# Altium PCB John_Main.PcbDoc (part 3 of 5)
Units mil, origin at the board's own origin, x right, y up, seen from the top; angles counter-clockwise.
Board outline 3346 x 2756 mil, 2 copper layers (Top Layer, Bottom Layer), stack 57 mil thick; 275 components, 161 nets, 721 pads, 398 vias.
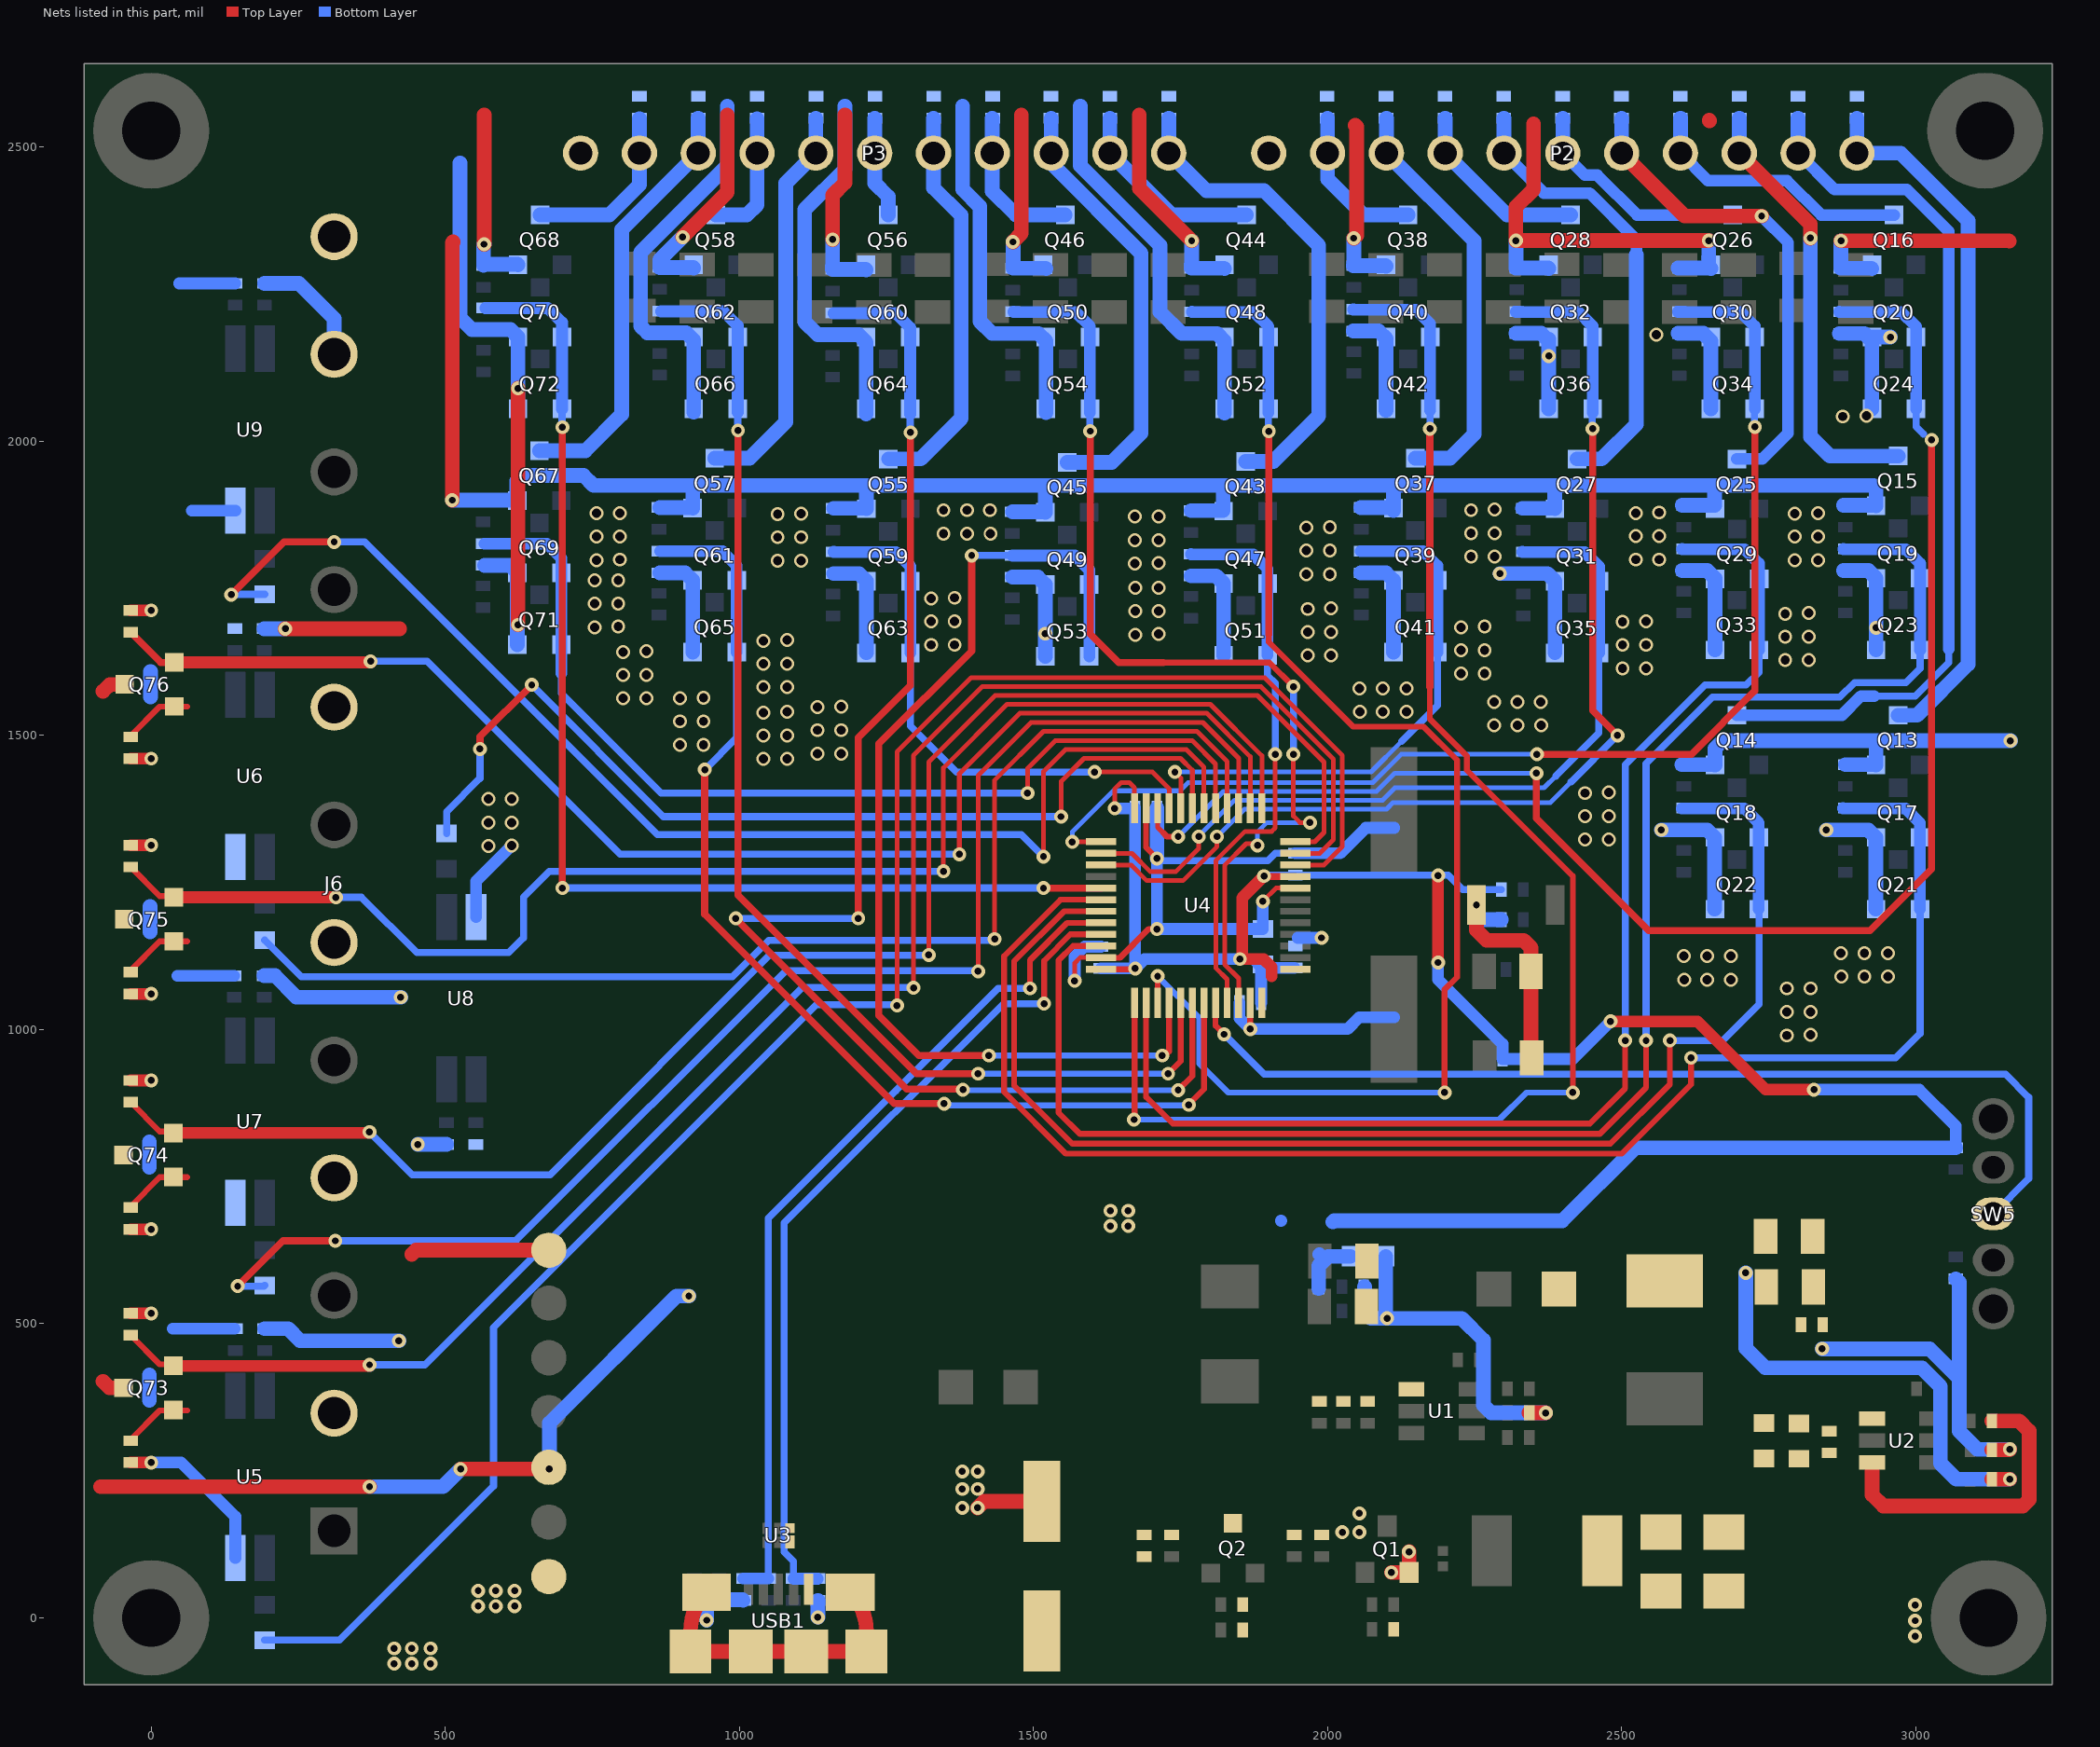
[diagram p2: the nets of this part, all layers, seen from the top]

## Part data (continued)
R67 R68 R69 R70 R79 R80 R81 R82 R87 R88 R98 R99 R100 R101 R110 R111 R112 R113 R118 R119: library part RC0402FR-07330RL, "RES SMD 330 OHM 1% 1/16W 0402", Case/Package=0402, Case Code (Metric)=1005, MANUFACTURER=Yageo, Max Operating Temperature=155°C, Max Power Dissipation=63mW, Min Operating Temperature=-55°C, Package Quantity=1, Power Rating=62.5mW, Supplier Part Number 1=311-330LRCT-ND, Temperature Coefficient=100ppm/°C, Tolerance=1%, Voltage Rating=50V, Case Code (Imperial)=0402, ComponentLink1Description=http://www.farnell.com/datasheets/1784430.pdf?src-supplier=Element14, ComponentLink1URL=http://www.farnell.com/datasheets/1784430.pdf?src-supplier=Element14, ComponentLink2Description=http://www.yageo.com/documents/recent/PYu-RC_Group_51_RoHS_L_9.pdf?src-supplier=Mouser, ComponentLink2URL=http://www.yageo.com/documents/recent/PYu-RC_Group_51_RoHS_L_9.pdf?src-supplier=Mouser, ComponentLink3Description=http://www.yageo.com/documents/recent/PYu-RC0402_51_RoHS_L_6_r.pdf?src-supplier=Future+Electronics, ComponentLink3URL=http://www.yageo.com/documents/recent/PYu-RC0402_51_RoHS_L_6_r.pdf?src-supplier=Future+Electronics, ComponentLink4Description=https://www.verical.com/server-webapp/html/getDatasheet?partID=329466&src-supplier=Verical, ComponentLink4URL=https://www.verical.com/server-webapp/html/getDatasheet?partID=329466&src-supplier=Verical, ComponentLink5Description=http://www.farnell.com/datasheets/1018594.pdf?src-supplier=Element14, ComponentLink5URL=http://www.farnell.com/datasheets/1018594.pdf?src-supplier=Element14, ComponentLink6Description=http://www.farnell.com/datasheets/2167052.pdf?src-supplier=Element14, ComponentLink6URL=http://www.farnell.com/datasheets/2167052.pdf?src-supplier=Element14, ComponentLink7Description=http://documents.rs-components.com/techlib://itc_doclist_GB.htm?stockno=6185810&src-supplier=RSComponents, ComponentLink7URL=http://documents.rs-components.com/techlib://itc_doclist_GB.htm?stockno=6185810&src-supplier=RSComponents, ComponentLink8Description=http://www.yageo.com/documents/recent/PYu-RC_Group_51_RoHS_L_10.pdf?src-supplier=Digi-Key, ComponentLink8URL=http://www.yageo.com/documents/recent/PYu-RC_Group_51_RoHS_L_10.pdf?src-supplier=Digi-Key, ComponentLink9Description=http://www.mouser.com/ds/2/447/PYu-RC0402_51_RoHS_L_6_r-8721.pdf?src-supplier=Mouser, ComponentLink9URL=http://www.mouser.com/ds/2/447/PYu-RC0402_51_RoHS_L_6_r-8721.pdf?src-supplier=Mouser, Composition="Thick Film", Depth=0.5mm, Features="Moisture Resistant", Height=0.016inch, Lead Free="Lead Free", Length=0.039inch, Manufacturer Part Number=RC0402FR-07330RL, Military Standard=Not, Number of Terminations=2, Packaging="Tape and Reel", Pricing 1="1=0.1, 10=0.016, 100=0.0067, 1000=0.003, 2500=0.0026, 5000=0.0022 (USD)", REACH SVHC=Unknown, Resistance=330R, Stock 1=6258760, Supplier 1=Digi-Key, Termination=SMD/SMT, Width=0.02inch
RF2: library part AC0402FR-0754K9L, "RES SMD 54.9K OHM 1% 1/16W 0402", Case/Package=0402, MANUFACTURER=Yageo, Max Operating Temperature=155°C, Max Power Dissipation=63mW, Min Operating Temperature=-55°C, Resistance=54.9kR, Supplier Part Number 1=YAG5675DKR-ND, Temperature Coefficient=100ppm/°C, Tolerance=1%, ComponentLink1Description=http://www.yageo.com/NewPortal/yageodocoutput?fileName=/pdf/R-Chip/PYu-AC_51_RoHS_L_6.pdf&src-supplier=Digi-Key, ComponentLink1URL=http://www.yageo.com/NewPortal/yageodocoutput?fileName=/pdf/R-Chip/PYu-AC_51_RoHS_L_6.pdf&src-supplier=Digi-Key, Composition="Thick Film", Features="Moisture Resistant,Automotive AEC-Q200", Height=0.015inch, Length=0.039inch, Manufacturer Part Number=AC0402FR-0754K9L, Number of Terminations=2, Packaging="Tape and Reel", Pricing 1="1=0.1, 10=0.021, 100=0.0087, 1000=0.0039, 2500=0.00338, 5000=0.00279 (USD)", Stock 1=3688, Supplier 1=Digi-Key, Width=0.02inch
RF10 RU1 RU2 RU3: library part RC0402JR-0720KL, "RES SMD 20K OHM 1% 1/16W 0402", Case/Package=0402, Case Code (Metric)=1005, MANUFACTURER=Yageo, Max Operating Temperature=155°C, Max Power Dissipation=63mW, Min Operating Temperature=-55°C, Package Quantity=1, Power Rating=62.5mW, Resistance=20kR, Supplier Part Number 1=311-20KJRCT-ND, Temperature Coefficient=100ppm/°C, Tolerance=5%, Voltage Rating=50V, Case Code (Imperial)=0402, ComponentLink1Description=https://industrial.panasonic.com/cdbs/www-data/pdf/RDA0000/AOA0000C301.pdf?src-supplier=Future+Electronics, ComponentLink1URL=https://industrial.panasonic.com/cdbs/www-data/pdf/RDA0000/AOA0000C301.pdf?src-supplier=Future+Electronics, ComponentLink2Description=http://www.jameco.com/Jameco/Products/ProdDS/1986781.pdf?src-supplier=Jameco, ComponentLink2URL=http://www.jameco.com/Jameco/Products/ProdDS/1986781.pdf?src-supplier=Jameco, ComponentLink3Description=http://www.farnell.com/datasheets/2059623.pdf?src-supplier=Farnell, ComponentLink3URL=http://www.farnell.com/datasheets/2059623.pdf?src-supplier=Farnell, ComponentLink4Description=http://industrial.panasonic.com/www-data/pdf/AOA0000/AOA0000CE1.pdf?src-supplier=Avnet, ComponentLink4URL=http://industrial.panasonic.com/www-data/pdf/AOA0000/AOA0000CE1.pdf?src-supplier=Avnet, ComponentLink5Description=http://www.alliedelec.com/m/d/51cd0790071e1666bdb9d00c57fcf960.pdf?src-supplier=Allied+Electronics, ComponentLink5URL=http://www.alliedelec.com/m/d/51cd0790071e1666bdb9d00c57fcf960.pdf?src-supplier=Allied+Electronics, ComponentLink6Description=http://industrial.panasonic.com/www-data/pdf/AOA0000/AOA0000CE1.pdf?src-supplier=Avnet+Europe, ComponentLink6URL=http://industrial.panasonic.com/www-data/pdf/AOA0000/AOA0000CE1.pdf?src-supplier=Avnet+Europe, ComponentLink7Description=http://www.farnell.com/datasheets/2059623.pdf?src-supplier=Element14, ComponentLink7URL=http://www.farnell.com/datasheets/2059623.pdf?src-supplier=Element14, ComponentLink8Description=http://industrial.panasonic.com/cdbs/www-data/pdf/RDA0000/AOA0000C301.pdf?src-supplier=Farnell, ComponentLink8URL=http://industrial.panasonic.com/cdbs/www-data/pdf/RDA0000/AOA0000C301.pdf?src-supplier=Farnell, ComponentLink9Description=http://industrial.panasonic.com/www-data/pdf/AOA0000/AOA0000CE1.pdf?src-supplier=Avnet+Asia, ComponentLink9URL=http://industrial.panasonic.com/www-data/pdf/AOA0000/AOA0000CE1.pdf?src-supplier=Avnet+Asia, ComponentLink10Description=http://www.yageo.com.tw/exep/pages/download/literatures/PYu-R_INT-thick_7.pdf?src-supplier=Digi-Key, ComponentLink10URL=http://www.yageo.com.tw/exep/pages/download/literatures/PYu-R_INT-thick_7.pdf?src-supplier=Digi-Key, ComponentLink11Description=http://www.yageo.com/NewPortal/yageodocoutput?fileName=/pdf/R-Chip/PYu-RC_51_RoHS_P_0.pdf&src-supplier=Digi-Key, ComponentLink11URL=http://www.yageo.com/NewPortal/yageodocoutput?fileName=/pdf/R-Chip/PYu-RC_51_RoHS_P_0.pdf&src-supplier=Digi-Key, ComponentLink12Description=http://www.yageo.com/documents/recent/PYu-RC0402_51_RoHS_L_6_r.pdf?src-supplier=Future+Electronics, ComponentLink12URL=http://www.yageo.com/documents/recent/PYu-RC0402_51_RoHS_L_6_r.pdf?src-supplier=Future+Electronics, ComponentLink13Description=http://www.mouser.com/ds/2/447/PYu-RC0402_51_RoHS_L_6_r-8721.pdf?src-supplier=Mouser, ComponentLink13URL=http://www.mouser.com/ds/2/447/PYu-RC0402_51_RoHS_L_6_r-8721.pdf?src-supplier=Mouser, ComponentLink14Description=http://www.yageo.com/documents/recent/PYu-RC0402_51_RoHS_L_6.pdf?src-supplier=Avnet+Europe, ComponentLink14URL=http://www.yageo.com/documents/recent/PYu-RC0402_51_RoHS_L_6.pdf?src-supplier=Avnet+Europe, ComponentLink15Description=http://www.yageo.com/documents/recent/PYu-RC_Group_51_RoHS_L_9.pdf?src-supplier=Digi-Key, ComponentLink15URL=http://www.yageo.com/documents/recent/PYu-RC_Group_51_RoHS_L_9.pdf?src-supplier=Digi-Key, ComponentLink16Description=http://www.farnell.com/datasheets/1018594.pdf?src-supplier=Element14, ComponentLink16URL=http://www.farnell.com/datasheets/1018594.pdf?src-supplier=Element14, Composition="Thick Film", Depth=0.5mm, Features="Moisture Resistant", Height=0.016inch, Lead Free="Lead Free", Length=0.039inch, Manufacturer Part Number=RC0402JR-0720KL, Military Standard=Not, Number of Pins=2, Number of Terminations=2, Packaging="Tape and Reel", Pricing 1="1=0.1, 10=0.013, 100=0.0053, 1000=0.0024, 2500=0.0021, 5000=0.0017 (USD)", REACH SVHC="No SVHC", Stock 1=4805429, Supplier 1=Digi-Key, Termination=SMD/SMT, Voltage Rating (DC)=50V, Width=0.02inch
RP1 RP2 RP3 RP4 RP5 RP6 RP7 RP8 RP9 RP10 RP11 RP12 RP13 RP14 RP15 RP16 RP17 RP18 RP19 RP20: library part AT0402FRE071KL, "RES SMD 1K OHM 1% 1/16W 0402", Case/Package=0402, Case Code (Metric)=1005, MANUFACTURER=Yageo, Max Operating Temperature=155°C, Max Power Dissipation=63mW, Min Operating Temperature=-55°C, Resistance=1kR, Resistor Type="Thin Film", Supplier Part Number 1=YAG2105CT-ND, Temperature Coefficient=50ppm/°C, Tolerance=1%, Case Code (Imperial)=0402, Category="Chip SMD Resistors", ComponentLink1Description=http://www.yageo.com/documents/recent/PYu-AT_51_RoHS_L-3.pdf?src-supplier=Digi-Key, ComponentLink1URL=http://www.yageo.com/documents/recent/PYu-AT_51_RoHS_L-3.pdf?src-supplier=Digi-Key, ComponentLink2Description=http://www.yageo.com/documents/recent/PYu-AT_51_RoHS_L_5.pdf?src-supplier=Digi-Key, ComponentLink2URL=http://www.yageo.com/documents/recent/PYu-AT_51_RoHS_L_5.pdf?src-supplier=Digi-Key, Features="Moisture Resistant,Automotive AEC-Q200,Anti-Sulfur", Height=0.014inch, Length=0.039inch, Manufacturer Part Number=AT0402FRE071KL, Number of Terminations=2, Packaging="Tape and Reel", Pricing 1="1=0.14000, 10=0.11800, 100=0.04620, 1000=0.01935, 2500=0.01774, 5000=0.01612 (USD)", RoHS=Yes, RoHS Compliant=Yes, Stock 1=559, Supplier 1=Digi-Key, Width=0.02inch
SW4: "SWITCH TACTILE SPST-NO 0.05A 12V", Contact Current Rating=50mA, Contact Resistance=100mR, Insulation Resistance=100MR, MANUFACTURER=Omron, Max Operating Temperature=70°C, Max Voltage Rating (DC)=12V, Min Operating Temperature=-25°C, Operating Force=1.5N, Package Quantity=1, Ratings="Dust Proof,IP40", Supplier Part Number 1=SW1020DKR-ND, Actuator Length=0.4mm, Actuator Type=Standard, ComponentLink1Description=http://www.farnell.com/datasheets/60838.pdf?src-supplier=Farnell, ComponentLink1URL=http://www.farnell.com/datasheets/60838.pdf?src-supplier=Farnell, ComponentLink2Description=http://www.farnell.com/datasheets/60838.pdf?src-supplier=Element14, ComponentLink2URL=http://www.farnell.com/datasheets/60838.pdf?src-supplier=Element14, ComponentLink3Description=https://omronfs.omron.com/en_US/ecb/products/pdf/en-b3u.pdf?src-supplier=Digi-Key, ComponentLink3URL=https://omronfs.omron.com/en_US/ecb/products/pdf/en-b3u.pdf?src-supplier=Digi-Key, ComponentLink4Description=http://www.omron.com/ecb/products/pdf/en-b3u.pdf?src-supplier=Digi-Key, ComponentLink4URL=http://www.omron.com/ecb/products/pdf/en-b3u.pdf?src-supplier=Digi-Key, ComponentLink5Description=https://www.distrelec.biz/Web/Downloads/he/et/B3U_eng_datasheet.pdf?mime=application%2Fpdf&src-supplier=Distrelec, ComponentLink5URL=https://www.distrelec.biz/Web/Downloads/he/et/B3U_eng_datasheet.pdf?mime=application%2Fpdf&src-supplier=Distrelec, ComponentLink6Description=http://www.onlinecomponents.com/productFiles/mf-OM/en-b3u.pdf?src-supplier=Onlinecomponents.com, ComponentLink6URL=http://www.onlinecomponents.com/productFiles/mf-OM/en-b3u.pdf?src-supplier=Onlinecomponents.com, ComponentLink7Description=https://www.verical.com/server-webapp/html/getDatasheet?partID=552554&src-supplier=Verical, ComponentLink7URL=https://www.verical.com/server-webapp/html/getDatasheet?partID=552554&src-supplier=Verical, ComponentLink8Description=http://www.farnell.com/datasheets/1685550.pdf?src-supplier=Element14, ComponentLink8URL=http://www.farnell.com/datasheets/1685550.pdf?src-supplier=Element14, ComponentLink9Description=http://www.farnell.com/datasheets/2610940.pdf?src-supplier=Farnell, ComponentLink9URL=http://www.farnell.com/datasheets/2610940.pdf?src-supplier=Farnell, ComponentLink10Description=https://www.alliedelec.com/m/d/4c8a9ef82804fc3c241a13c1e298fd73.pdf?src-supplier=Allied+Electronics, ComponentLink10URL=https://www.alliedelec.com/m/d/4c8a9ef82804fc3c241a13c1e298fd73.pdf?src-supplier=Allied+Electronics, Contact Material=Silver, Current Rating=50mA, Depth=2.5mm, Electrical Life=200000Cycles, Height=1.2mm, Illumination Type=Non-Illuminated,Illuminated, Lead Free="Lead Free", Length=4mm, Manufacturer Part Number=B3U-1000P, Max Current Rating=50mA, Mechanical Life=200000Cycles, Mount="Surface Mount", Orientation=Straight, Packaging="Tape and Reel", Pricing 1="1=1, 10=0.961, 25=0.9064, 50=0.7976, 100=0.7251, 250=0.68888, 500=0.67074, 1000=0.52571 (USD)", REACH SVHC=Unknown, Stock 1=116454, Supplier 1=Digi-Key, Switch Function=Off-Mom, Switch Travel=0.15mm, Termination=SMD/SMT, Throw Configuration=SPST, Voltage Rating (DC)=12V, Weight=0.000776oz, Width=3mm
SW5: "2 Position SPDT Miniature Slide Switch 100MA 12V Through Hole, Right Angle", Contact Current Rating=100mA, Contact Resistance=20mR, Insulation Resistance=100MR, MANUFACTURER="ITT C&K", Max Operating Temperature=70°C, Max Voltage Rating (DC)=12V, Min Operating Temperature=-10°C, Package Quantity=300, Supplier Part Number 1=CKN9559-ND, Actuator Length=4mm, Actuator Material=Polyoxymethylene,Acetal,Polyacetal, Actuator Type=Standard, Body Material=Tin, ComponentLink1Description=http://www.jameco.com/Jameco/Products/ProdDS/588220.pdf?src-supplier=Jameco, ComponentLink1URL=http://www.jameco.com/Jameco/Products/ProdDS/588220.pdf?src-supplier=Jameco, ComponentLink2Description=http://uk.rs-online.com/webdocs/1263/0900766b81263f61.pdf?src-supplier=RSComponents, ComponentLink2URL=http://uk.rs-online.com/webdocs/1263/0900766b81263f61.pdf?src-supplier=RSComponents, ComponentLink3Description=http://www.farnell.com/datasheets/1683358.pdf?src-supplier=Element14, ComponentLink3URL=http://www.farnell.com/datasheets/1683358.pdf?src-supplier=Element14, ComponentLink4Description=http://www1.futureelectronics.com/doc/C%20-%20K%20COMPONENTS/OS102011MA1QN1.pdf?src-supplier=Future+Electronics, ComponentLink4URL=http://www1.futureelectronics.com/doc/C%20-%20K%20COMPONENTS/OS102011MA1QN1.pdf?src-supplier=Future+Electronics, ComponentLink5Description=https://www.ckswitches.com/media/1428/os.pdf?src-supplier=Digi-Key, ComponentLink5URL=https://www.ckswitches.com/media/1428/os.pdf?src-supplier=Digi-Key, ComponentLink6Description=https://www.alliedelec.com/m/d/08271ccc8b1809c6b911a7d3c93f3e8a.pdf?src-supplier=Allied+Electronics, ComponentLink6URL=https://www.alliedelec.com/m/d/08271ccc8b1809c6b911a7d3c93f3e8a.pdf?src-supplier=Allied+Electronics, ComponentLink7Description=http://www.farnell.com/datasheets/2674787.pdf?src-supplier=Newark, ComponentLink7URL=http://www.farnell.com/datasheets/2674787.pdf?src-supplier=Newark, Contact Material="Copper Alloy,Brass,Silver", Contact Plating=Silver,Gold, Contact Style=Non-Shorting, Current Rating=100mA, Depth=8.4mm, Electrical Life=10000Cycles, Housing Material=Resin, Lead Free="Lead Free", Length=8.6mm, Manufacturer Part Number=OS102011MA1QN1, Max Current Rating=100mA, Mechanical Life=10000Cycles, Mount="Through Hole,Brackets,PCB", Orientation="Right Angle", Packaging=Bulk, Pricing 1="1=0.38, 10=0.363, 25=0.3552, 50=0.3176, 100=0.3024, 250=0.2948, 500=0.2495, 1000=0.2419, 5000=0.2117 (USD)", Radiation Hardening=No, REACH SVHC="No SVHC", Stock 1=24069, Supplier 1=Digi-Key, Switch Function=On-On, Switch Travel=2mm, Termination="PC Pins", Throw Configuration=SPDT, Voltage Rating (DC)=12V, Width=4.4mm
U1 U2: "IC REG BUCK ADJ 3A TSOT23-6", Case/Package=SOT-23-6, MANUFACTURER="Texas Instruments", Max Input Voltage=17V, Max Operating Temperature=125°C, Max Output Voltage=7V, Min Input Voltage=4.5V, Min Operating Temperature=-40°C, Min Output Voltage=768mV, Output Current=3A, Quiescent Current=400uA, Supplier Part Number 1=296-47238-6-ND, Switching Frequency=580kHz, ComponentLink1Description=http://www.ti.com/lit/ds/symlink/tps563201.pdf?src-supplier=Digi-Key, ComponentLink1URL=http://www.ti.com/lit/ds/symlink/tps563201.pdf?src-supplier=Digi-Key, ComponentLink2Description=http://www.ti.com/general/docs/suppproductinfo.tsp?distId=10&amp;gotoUrl=http%3A%2F%2Fwww.ti.com%2Flit%2Fgpn%2Ftps563201&src-supplier=Digi-Key, ComponentLink2URL=http://www.ti.com/general/docs/suppproductinfo.tsp?distId=10&amp;gotoUrl=http%3A%2F%2Fwww.ti.com%2Flit%2Fgpn%2Ftps563201&src-supplier=Digi-Key, ComponentLink3Description=http://www.ti.com/lit/gpn/tps563201?src-supplier=Mouser, ComponentLink3URL=http://www.ti.com/lit/gpn/tps563201?src-supplier=Mouser, Lead Free="Lead Free", Manufacturer Part Number=TPS563201DDCR, Mount="Surface Mount", Number of Outputs=1, Number of Pins=6, Output Configuration=Positive, Output Type=Adjustable, Packaging="Tape and Reel", Pricing 1="1=0.92, 10=0.812, 25=0.7628, 100=0.5781, 250=0.492, 500=0.4674, 1000=0.3567 (USD)", Stock 1=0, Supplier 1=Digi-Key, Synchronous Rectifier=Yes
U3: "TVS DIODE 5V 6.8V 6UDFN", Capacitance=1E-12F, Clamping Voltage=6.8V, MANUFACTURER=Littelfuse, Max Operating Temperature=125°C, Max Surge Current=8A, Min Operating Temperature=-40°C, Package Quantity=3000, Power Line Protection=Yes, Reverse Standoff Voltage=5V, Supplier Part Number 1=F6501DKR-ND, ComponentLink1Description=http://www.mouser.com/ds/2/240/Littelfuse_TVS_Diode_Array_SP3014_Datasheet.pdf-364113.pdf?src-supplier=Mouser, ComponentLink1URL=http://www.mouser.com/ds/2/240/Littelfuse_TVS_Diode_Array_SP3014_Datasheet.pdf-364113.pdf?src-supplier=Mouser, ComponentLink2Description=https://www.littelfuse.com/~/media/electronics/datasheets/tvs_diode_arrays/littelfuse_tvs_diode_array_sp3014_datasheet.pdf.pdf?src-supplier=Digi-Key, ComponentLink2URL=https://www.littelfuse.com/~/media/electronics/datasheets/tvs_diode_arrays/littelfuse_tvs_diode_array_sp3014_datasheet.pdf.pdf?src-supplier=Digi-Key, ComponentLink3Description=http://www.littelfuse.com/~/media/electronics/datasheets/tvs_diode_arrays/littelfuse_tvs_diode_array_sp3014_datasheet.pdf.pdf?src-supplier=Digi-Key, ComponentLink3URL=http://www.littelfuse.com/~/media/electronics/datasheets/tvs_diode_arrays/littelfuse_tvs_diode_array_sp3014_datasheet.pdf.pdf?src-supplier=Digi-Key, ComponentLink4Description=http://www.farnell.com/datasheets/2291833.pdf?src-supplier=Element14, ComponentLink4URL=http://www.farnell.com/datasheets/2291833.pdf?src-supplier=Element14, ComponentLink5Description=http://www.farnell.com/datasheets/2291833.pdf?src-supplier=Farnell, ComponentLink5URL=http://www.farnell.com/datasheets/2291833.pdf?src-supplier=Farnell, ComponentLink6Description=http://www.farnell.com/datasheets/2291833.pdf?src-supplier=Newark, ComponentLink6URL=http://www.farnell.com/datasheets/2291833.pdf?src-supplier=Newark, Height=0.55mm, Length=1.65mm, Manufacturer Part Number=SP3014-02UTG, Mount="Surface Mount", Number of Bidirectional Channels=2, Number of Channels=2, Number of Pins=6, Packaging="Tape and Reel", Peak Pulse Current=8A, Polarity=Unidirectional, Pricing 1="1=0.56, 10=0.495, 25=0.4652, 100=0.3375, 250=0.32552, 500=0.282, 1000=0.24 (USD)", Stock 1=3888, Supplier 1=Digi-Key, Termination=SMD/SMT, Width=1.05mm, Working Voltage=5V
U4: "IC MCU 32BIT 128KB FLASH 48LQFP"
U5 U6 U7 U8 U9: "TransistorOptocouplers DC 1 2500Vrms SOP-4_P1.27 Optocouplers RoHS", Case/Package=SOIC, Collector Emitter Saturation Voltage=300mV, Forward Voltage=1.2V, MANUFACTURER=CEL, Max Collector Current=30mA, Max Operating Temperature=100°C, Max Output Voltage=80V, Max Power Dissipation=120mW, Min Operating Temperature=-55°C, Package Quantity=1, Supplier Part Number 1=PS2801C-1-F3-ACT-ND, Collector Emitter Voltage (VCEO)=300mV, ComponentLink1Description=http://www.cel.com/pdf/datasheets/PS2801C-1,PS2801C-4.pdf?src-supplier=Digi-Key, ComponentLink1URL=http://www.cel.com/pdf/datasheets/PS2801C-1,PS2801C-4.pdf?src-supplier=Digi-Key, ComponentLink2Description=http://www.cel.com/pdf/datasheets/how_to_order_optos.pdf?src-supplier=Digi-Key, ComponentLink2URL=http://www.cel.com/pdf/datasheets/how_to_order_optos.pdf?src-supplier=Digi-Key, ComponentLink3Description=http://datasheet.iiic.cc/cel/PS2801C-1-F3-A.pdf?src-supplier=IIIC, ComponentLink3URL=http://datasheet.iiic.cc/cel/PS2801C-1-F3-A.pdf?src-supplier=IIIC, Lead Free="Lead Free", Manufacturer Part Number=PS2801C-1-F3-A, Mount="Surface Mount", Number of Channels=1, Number of Pins=4, Output Current per Channel=30mA, Packaging="Tape and Reel", Pricing 1="1=0.77, 10=0.595, 100=0.3825 (USD)", Stock 1=399, Supplier 1=Digi-Key
USB1: library part "Micro Usb Conn SMD", "CONN USB MICRO B RECPT SMT R/A", Colour=Black, Current Rating=1.8A, Flammability Rating="UL94 V-0", Insulation Resistance=1GR, MANUFACTURER="Amphenol FCI", Max Operating Temperature=85°C, Max Voltage Rating (AC)=100V, Min Operating Temperature=-55°C, Package Quantity=1400, Supplier Part Number 1=609-4613-1-ND, ComponentLink1Description=https://datasheet.ciiva.com/26853/getdatasheetpartid-418041-26853891.pdf, ComponentLink1URL=https://datasheet.ciiva.com/26853/getdatasheetpartid-418041-26853891.pdf, ComponentLink2Description=https://datasheet.ciiva.com/851/10118192-851112.pdf, ComponentLink2URL=https://datasheet.ciiva.com/851/10118192-851112.pdf, ComponentLink3Description=https://datasheet.ciiva.com/4598/10118192ac-197249-4598796.pdf, ComponentLink3URL=https://datasheet.ciiva.com/4598/10118192ac-197249-4598796.pdf, Connector Type=USB,Receptacle, Contact Material="Copper Alloy", Contact Plating=Nickel,Gold, Depth=5.57mm, Gender=Receptacle, Housing Material=Polymer, Lead Free="Lead Free", Length=7.86mm, Manufacturer Part Number=10118192-0001LF, Mount="Surface Mount,Horizontal", Number of Contacts=5, Number of Ports=1, Number of Terminals=5, Orientation="Right Angle", Packaging="Tape and Reel", Pitch=0.65mm, Pricing 1="1=0.42, 10=0.393, 25=0.3536, 50=0.3144, 100=0.3013, 250=0.2751, 500=0.262 (USD)", Radiation Hardening=No, REACH SVHC="No SVHC", Stock 1=203283, Supplier 1=Digi-Key, Termination=Solder, USB Standard="USB 2.0", Voltage Rating=100V
X1: "8MHz ±20ppm 20pF SMD,12.5x4.5mm SMD Crystal Resonators RoHS", MANUFACTURER="Suzhou Liming Elec", Package=Custom, Manufacturer Part No=49MD-8.000-20-20-20/A
J1 J2 J3 J4 J5 J7 J8: LatestRevisionDate=17-Jul-2002, LatestRevisionNote="Re-released for DXP Platform.", Publisher="Altium Limited"

## Free pads (board coordinates)
  round 196.85 hole 98.43: MH(0,2528) MH(0,0) MH(3118,2528) MH(3124,0)

## Via types
v1: diameter 23.62, hole 11.81, Top Layer to Bottom Layer, tented both sides, 233 vias
v2: diameter 23.62, hole 15.75, Top Layer to Bottom Layer, tented both sides, 165 vias

## Nets (pads, with @x,y where several pads share a name; then routed paths per layer and width w, separated by ;. In a path a pad name is that pad's centre, name@x,y a point inside that pad or via, vN(x,y) a via of type N, cw(c..) or ccw(c..) an arc to the next point about the centre after c; other vN are vias at no path point)
5V: CF6.1 CF7.1 CF8.1 D1.A LF1.2 Q13.2 Q14.2 Q15.2 Q16.2 Q25.2 Q26.2 Q27.2 Q28.2 Q37.2 Q38.2 Q43.2 Q44.2 Q45.2 Q46.2 Q55.2 Q56.2 Q57.2 Q58.2 Q67.2 Q68.2 R59.2 R60.2 R61.2 R62.2 R71.2 R72.2 R73.2 R74.2 R83.2 R84.2 R90.2 R91.2 R92.2 R93.2 R102.2 R103.2 R104.2 R105.2 R114.2 R115.2 RF2.1 | length 8227.9
  Top Layer w25: v1(511.78,1900) 511.78,2337.78 513,2339 ; v1(566,2335) 566,2555 ; v1(903.48,2347.23) 979.5,2423.25 979.5,2555 ; v1(1158.49,2343) 1158.49,2418.49 1179.5,2439.5 1179.5,2555 ; v1(1465,2339) 1479.5,2353.5 1479.5,2555 ; 1680,2555 1680,2430 v1(1769,2341) ; v1(2044.56,2345.32) 2049.5,2350.27 2049.5,2534.5 2047,2537 ; 2350,2540 2350,2428.19 2320.19,2398.38 v1(2320.19,2341.32) v1(2648.05,2341.32) ; 2649,2546 2649,2545.55 2649.5,2545.05 ; v1(2872.78,2341) 3158,2341 3159,2340 ; RF2.1@3129.45,235.68 v1(3159.94,235.68)
  Bottom Layer w25: v1@511.78,1900.18 R114.2@564.37,1900.18 ; R115.2@565.09,2299 565.09,2334.09 v1(566,2335) ; R114.2@566.99,1900.18 621.78,1900.18 621.78,1932.68 631.09,1942 735,1942 752,1925 924,1925 ; R115.2@568.09,2301 622.87,2301 Q68.2@623.69,2300.18 ; R105.2@864.5,2295.5 864.5,2308.25 v1(903.48,2347.23) ; R104.2@865,1887.5 919.78,1887.5 Q57.2@920.6,1886.68 920.6,1921.6 924,1925 ; R105.2@866.76,2295.5 921.54,2295.5 Q58.2@922.36,2294.67 ; R103.2@1158.48,2292.18 v1(1158.49,2343) ; R103.2@1159.99,2292.18 1214.78,2292.18 Q56.2@1215.6,2291.35 ; R102.2@1160.43,1886.18 1215.21,1886.18 Q55.2@1216.03,1885.36 1216.03,1920.97 1212,1925 ; R92.2@1464.52,1880.26 1519.3,1880.26 Q45.2@1520.12,1879.44 1520.12,1922.12 1523,1925 ; v1(1465,2339) 1465.61,2338.39 1465.61,2294.26 1520.39,2294.26 Q46.2@1521.21,2293.44 ; R90.2@1767.61,1882.17 R90.2@1767.96,1882.17 1822.39,1882.17 1822.39,1925 ; v1(1769,2341) 1769.17,2340.83 R91.2@1769.17,2294.17 1823.97,2294.17 Q44.2@1824.79,2293.35 ; R84.2@2044,2298.5 R84.2@2044.72,2298.5 ; v1@2044.72,2345.16 R84.2@2044.72,2298.5 ; R83.2@2056.45,1887.5 R83.2@2057.55,1887.5 2111.23,1887.5 Q37.2@2112.06,1886.67 ; Q38.2@2099.6,2297.67 2098.78,2298.5 R84.2@2044.72,2298.5 ; Q37.2@2112.23,1882.5 2112.23,1920.97 ; v1@2320.36,2341.16 2320.36,2294.5 R74.2@2321.82,2294.5 2375.14,2294.5 Q28.2@2375.96,2293.67 ; R73.2@2330.99,1886.18 R73.2@2332.83,1886.18 2385.78,1886.18 Q27.2@2386.6,1885.35 ; Q27.2@2386.03,1887.36 2386.03,1922.97 ; R72.2@2596,2294.5 R72.2@2598.21,2294.5 Q26.2@2648.21,2294.5 ; R60.2@2602.49,1450.5 R60.2@2605.58,1450.5 2657.27,1450.5 Q14.2@2658.09,1449.67 ; R71.2@2602.99,1891.18 R71.2@2605.58,1891.18 2658.12,1891.18 2658.12,1924.12 ; v1@2648.21,2341.16 Q26.2@2648.21,2294.5 ; Q26.2@2651.61,2293.67 2650.79,2294.5 Q26.2@2648.21,2294.5 ; Q14.2@2658.6,1449.67 2658.6,1477.54 2672.06,1491 2936,1491 ; v1(2710.94,586.5) 2710.94,458.5 2744.44,425 3010.44,425 3041.94,393.5 3041.94,262.5 3068.76,235.68 v1(3159.94,235.68) ; v1@2872.95,2340.84 R62.2@2872.95,2294.18 2924.78,2294.18 Q16.2@2925.6,2293.35 ; R61.2@2876.99,1891.18 R61.2@2880.32,1891.18 2931.78,1891.18 Q15.2@2932.6,1890.35 2932.6,1920.4 2928,1925 2095.14,1925 1822.39,1925 ; R59.2@2880.32,1450.5 2931.27,1450.5 Q13.2@2932.09,1449.67 ; Q13.2@2932.6,1449.67 2932.6,1487.6 2936,1491 ; v1(3161,1491) 2936,1491 ; 924,1925 1212,1925 ; 1212,1925 1523,1925 ; 1523,1925 1692,1925 1822.39,1925
12V: C15.2 C16.2 CF2.1 CF3.1 CF4.1 F1.2 RF10.2 U2.3 | length 521.8
  Top Layer w25: U2.3@2925.76,264.1 2925.76,209.24 2945,190 3182,190 3193,201 3193,317.5 3175.82,334.68 RF10.2@3129.45,334.68
12V_IN: C11.1 C12.2 C13.2 J6.11 J7.1 Q1.2 Q2.3 R6.1 R7.1 R11.2 R15.2 R18.2 R23.2 R24.2 | length 1381.7
  Top Layer w25: v1(228,1681.5) 422.5,1681.5 ; 443,618 450,625 J7.1@676,625 ; v1(1405,187) 1416.04,198.04 C11.1@1514.1,198.04 ; v1(2108.47,77.13) Q1.2@2138.5,77.13 v1(2138.5,112.4)
  Bottom Layer w25: R15.2@192,1091.69 210.31,1091.69 247,1055 v1(424.24,1055) ; R18.2@192.38,1681.5 v1(228,1681.5) ; R24.2@192.52,2268.52 250.98,2268.52 311,2208.5 J6.11@311,2148 ; R11.2@193,491.5 232.77,491.5 253.27,471 v1(421,471) ; v1(453.21,804.79) R23.2@502.12,804.79
  other v1: 413,-78 443,-78 475,-78 413,-52 443,-52 475,-52 2025.1,145.5 2054.1,145.5 2054.1,177.5 1379,187 1379,219 1405,219 1379,249 1405,249
BOOT0#: SW5.2 U4.44 | length 1694.9
  Top Layer w10: U4.44@1809.53,1045.65 1809.53,1006.47 v1(1824,992)
  Bottom Layer w12: v1(1824,992) 1892,924 3153,924 3192,885 3192,746.92 SW5.2@3132,686.92
DM: C34.1 R16.1 U4.32 | length 1457
  Top Layer w10: v1(1494,1070) 1494,1118 1557.47,1181.47 U4.32@1614.65,1181.47
  Bottom Layer w12: R16.1@1049.36,66.82 1049.36,679.36 1251.19,881.19 1251.28,881.19 1265.81,895.72 1265.81,895.81 1440,1070 v1(1494,1070)
  Bottom Layer w20: C34.1@1006.36,66.82 C34.1@1007.36,66.82 R16.1@1049.36,66.82
DP: C35.1 R17.1 U4.33 | length 1436.7
  Top Layer w10: v1(1518,1044) 1518,1117.04 1562.75,1161.79 U4.33@1614.65,1161.79
  Bottom Layer w12: R17.1@1092.03,66.82 1092.03,96.24 1076.36,111.9 1076.36,671.36 1449,1044 v1(1518,1044)
  Bottom Layer w20: R17.1@1092.03,66.82 1092.34,66.5 C35.1@1133.36,66.5
GND: C1.2 C8.2 C9.1 C10.2 C11.2 C12.1 C15.1 C16.1 C17.1 C23.2 C25.1 C32.2 C33.2 C34.2 C35.2 CF1.2 CF2.2 CF3.2 CF4.2 CF6.2 CF7.2 CF8.2 CS1.1 CU1.2 CU2.2 CU3.2 CU4.2 CU5.2 CU6.2 CU7.2 CU8.1 CU9.1 CU10.1 J5.1 J6.12 LED1.2 LED2.2 P2.11 P3.11 Q17.2 Q18.2 Q19.2 Q20.2 Q21.2 Q22.2 Q23.2 Q24.2 Q29.2 Q30.2 Q31.2 Q32.2 Q33.2 Q34.2 Q35.2 Q36.2 Q39.2 Q40.2 Q41.2 Q42.2 Q47.2 Q48.2 Q49.2 Q50.2 Q51.2 Q52.2 Q53.2 Q54.2 Q59.2 Q60.2 Q61.2 Q62.2 Q63.2 Q64.2 Q65.2 Q66.2 Q69.2 Q70.2 Q71.2 Q72.2 R4.1 R9.2 R10.1 R12.1 R19.1 R20.1 R25.1 R26.1 R38.1 R46.1 R48.1 R50.1 R63.2 R64.2 R65.2 R66.2 R75.2 R76.2 R77.2 R78.2 R85.2 R86.2 R94.2 R95.2 R96.2 R97.2 R106.2 R107.2 R108.2 R109.2 R116.2 R117.2 R120.2 R121.2 R122.2 R123.2 RF3.1 RP1.1 RP2.1 RP3.1 RP4.1 RP5.1 RP6.1 RP7.1 RP8.1 RP9.1 RP10.1 RP11.1 RP12.1 RP13.1 RP14.1 RP15.1 RP16.1 RP17.1 RP18.1 RP19.1 RP20.1 RU3.2 SW4.1 U1.1 U2.1 U3.3 U3.4 U4.8 U4.23 U4.35 U4.47 U5.2 U6.2 U7.2 U8.2 U9.2 USB1.5 USB1.MP1 USB1.MP2 USB1.MP3 USB1.MP4 USB1.MP5 USB1.MP6 | length 11541.5
  Top Layer w8: v1(1570,1083) 1570,1113 1579.42,1122.42 U4.35@1614.65,1122.42 ; v1(1890,1218) 1912.53,1240.53 U4.8@1945.35,1240.53
  Top Layer w10: U4.35@1614.65,1122.42 1615.06,1122 1646.96,1122 1695.96,1171 v1(1710,1171) ; U4.23@1691.42,1376.35 1691.42,1309.58 v1(1710,1291) ; v1(1868.58,1001) U4.47@1868.58,1045.65
  Top Layer w20: R120.2@-35,264 -0.1,264 v1(0,264.1) ; R38.1@-35,517.5 v1@-0.1,517.5 ; R121.2@-35,660.5 v1@-0.1,660.5 ; R46.1@-35,913.5 v1@-0.1,913.5 ; R122.2@-35,1060.5 v1@-0.1,1060.5 ; R48.1@-35,1313.5 v1@-0.1,1313.5 ; R123.2@-35,1460.5 v1@-0.1,1460.5 ; R50.1@-35,1712.5 v1@-0.1,1712.5
  Top Layer w25: v1(623.69,1688) v1(623.69,2090) ; USB1.MP1@944.39,43.39 ccw(c1010.92,-23.14) 916.83,-23.14 USB1.MP6@916.83,-57 USB1.MP5@1019.19,-57 USB1.MP4@1113.68,-57 USB1.MP3@1216.04,-57 1216.04,-23.14 ccw(c1121.95,-23.14) USB1.MP2@1188.48,43.39 ; v1(2253.07,1212) 2253.07,1168.93 2270.5,1151.5 2333.5,1151.5 2346,1139 LED2.2@2346,1103 ; R4.1@2342.81,348.5 v1(2370.94,348.5) ; LED2.2@2346,1099 2346,953 LED1.2@2347,952 ; RF3.1@3129.45,285.68 3159.12,285.68 v1(3159.94,286.5)
  Bottom Layer w12: v1@1709.92,1291.08 v1(1710,1291) 1714,1287 1898.68,1287 1911.26,1299.58 CU7.2@1945.35,1299.58
  Bottom Layer w20: v1(0,264.1) 50.9,264.1 143,172 U5.2@143,102 ; 36.95,491.5 R12.1@142,491.5 ; 44.31,1091.69 R20.1@141,1091.69 ; 47.48,2268.52 R26.1@142.52,2268.52 ; 68.84,1882.02 U9.2@143,1882.02 ; U8.2@552.12,1191.29 552.12,1252.12 v2(613,1313) ; v1(1570,1083) 1570,1124 1586.92,1140.92 CU2.2@1614.65,1140.92 ; v1@1710,1173 v1(1710,1291) ; v1@1712,1171 CU5.2@1890,1171 v1(1890,1218) ; CU3.2@1850.08,1045.65 1850.08,1019.5 v1(1868.58,1001) 2034,1001 2053.98,1020.98 CU9.1@2113,1020.98 ; CU7.2@1945.35,1299.58 2021.58,1299.58 2064.99,1342.99 CU10.1@2113,1342.99 ; 1949,1156 v1(1990,1156)
  Bottom Layer w25: -3.14,765.83 -3.14,808.83 ; -3,370 -3,413 ; -2.13,1166.5 -2.13,1209.5 ; -1.28,1565.83 -1.28,1608.83 ; 525,2473 525,2210.18 545.18,2190 R117.2@565.09,2190 ; R116.2@566.99,1789.18 609.78,1789.18 Q69.2@622.6,1776.35 Q71.2@622.6,1654.35 ; R117.2@568.09,2190 610.87,2190 Q70.2@623.69,2177.18 v1(623.69,2090) Q72.2@623.69,2055.18 ; R108.2@865,1776.5 907.78,1776.5 Q61.2@920.6,1763.68 Q65.2@920.6,1641.68 ; Q66.2@922.36,2049.67 Q66.2@922.36,2055.18 922.36,2171.67 909.54,2184.5 R109.2@864.5,2184.5 843.5,2184.5 832,2196 832,2321 979.5,2468.5 979.5,2570 ; v1(944.36,-4) 944.36,31 1005.17,31 C34.2@1006.36,29.82 ; v1(1133.36,1) C35.2@1133.36,29.5 ; R106.2@1160.43,1775.18 1203.21,1775.18 Q59.2@1216.03,1762.36 Q63.2@1216.03,1640.36 ; 1179.5,2570 1179.5,2462.5 1111,2394 1111,2203.33 1133.16,2181.18 R107.2@1158.48,2181.18 1202.78,2181.18 1215.6,2168.35 Q64.2@1215.6,2055.18 Q64.2@1215.6,2046.35 ; 1379.5,2570 1379.5,2428.5 1409,2399 1409,2204 1429.74,2183.26 R97.2@1464.84,2183.26 ; R96.2@1464.52,1769.26 1507.3,1769.26 Q49.2@1520.12,1756.44 v1(1520.12,1673) Q53.2@1520.12,1634.44 ; R97.2@1465.61,2183.26 1508.39,2183.26 1521.21,2170.44 Q54.2@1521.21,2055.18 Q54.2@1521.21,2048.44 ; 1579.5,2570 1579.5,2468.5 1715,2333 1715,2220 1751.83,2183.17 R95.2@1769.17,2183.17 ; v1@1709.92,1291.08 CU1.2@1709.92,1327 CU6.2@1709.92,1376.35 ; R94.2@1767.61,1771.17 R94.2@1767.96,1771.17 1810.39,1771.17 Q47.2@1823.21,1758.35 Q51.2@1823.21,1636.35 ; R95.2@1769.17,2183.17 1811.97,2183.17 1824.79,2170.35 Q52.2@1824.79,2055.18 Q52.2@1824.79,2048.35 ; R86.2@2044,2187.5 R86.2@2044.72,2187.5 2086.78,2187.5 2099.6,2174.67 Q42.2@2099.6,2055.18 Q42.2@2099.6,2052.67 ; R85.2@2056.45,1776.5 R85.2@2057.55,1776.5 2099.23,1776.5 Q39.2@2112.06,1763.67 Q41.2@2112.06,1641.67 ; C23.2@2061.44,521.88 2074.13,509.19 v1(2101.25,509.19) ; C23.2@2062.94,521.88 C8.2@2062.94,562.88 ; C25.1@2098.94,614.5 2098.94,511.5 v1(2101.25,509.19) ; v1(2253.07,1212) 2253.07,1197.93 2264,1187 CU8.1@2295.5,1187 ; v1(2293,1775.18) R77.2@2332.83,1775.18 2373.78,1775.18 Q31.2@2386.6,1762.35 Q35.2@2386.6,1640.35 ; R78.2@2320.36,2183.5 R78.2@2321.82,2183.5 2363.14,2183.5 Q32.2@2372.71,2173.93 ; v1(2370.94,348.5) 2277.94,348.5 2264.94,361.5 2264.94,472.33 2228.09,509.19 v1(2101.25,509.19) ; Q36.2@2375.96,2055.18 v1(2375.96,2145) Q32.2@2375.96,2173.93 ; v1(2567.5,1339.5) R64.2@2605.58,1339.5 2645.27,1339.5 2658.09,1326.67 Q22.2@2658.09,1204.67 ; R76.2@2596,2183.5 R76.2@2598.21,2183.5 2638.79,2183.5 2651.61,2170.67 Q34.2@2651.61,2055.18 ; R75.2@2602.99,1780.18 R75.2@2605.58,1780.18 2645.78,1780.18 2658.6,1767.35 Q33.2@2658.6,1645.35 ; v1(2840.94,457.5) 2841.44,457 3023.7,457 3073.94,406.75 ; v1(2848,1339.5) R63.2@2880.32,1339.5 2919.27,1339.5 2932.09,1326.67 Q21.2@2932.09,1204.67 ; R66.2@2869.99,2183.18 R66.2@2872.95,2183.18 2912.78,2183.18 2925.6,2170.35 Q24.2@2925.6,2055.18 ; R65.2@2876.99,1780.18 R65.2@2880.32,1780.18 2919.78,1780.18 Q19.2@2932.6,1767.35 v1(2932.6,1683) Q23.2@2932.6,1645.35 ; Q20.2@2925.6,2177.18 v1@2956.82,2177.18 ; RU3.2@3068,576.5 3073.94,570.56 3073.94,406.75 ; v1(3159.94,286.5) 3104.94,286.5 3073.94,317.5 3073.94,406.75
  other v1: 2999,-31.12 2999,-4.8 555.9,20 585.9,20 617.9,20 2999,22 555.9,46 585.9,46 617.9,46 0,517.6 0,660.6 0,913.6 0,1060.6 0,1313.6 0,1460.6 0,1712.6 2957,2177
  other v2: 2781,990 2821,991 2781,1030 2821,1030 2781,1070 2821,1070 2606.58,1085 2645.58,1085 2685.58,1085 2873.78,1090 2912.78,1090 2952.78,1090 2605.58,1125 2645.58,1125 2685.58,1125 2872.78,1130 2912.78,1130 2952.78,1130 573,1312 2438,1323 2478,1323 573,1352 613,1352 2438,1363 2478,1363 573,1392 613,1392 2438,1402 2478,1403 1041,1460 1081,1460 1133,1469 1173,1469 899,1484 939,1484 1041,1500 1081,1500 1133,1509 1173,1509 2283.14,1517 2323.14,1517 2363.14,1517 899,1524 939,1524 1041,1539 1081,1540 2055.1,1540 2094.1,1540 2134.1,1540 1133,1548 1173,1549 2283.14,1557 2323.14,1557 2362.14,1557 802,1563 842,1563 899,1563 939,1564 2054.1,1580 2094.1,1580 2134.1,1580 1041,1582 1081,1582 802,1603 842,1603 2227,1605 2267,1605 2501.5,1614 2541.5,1614 1041,1622 1081,1622 2778,1628 2818,1628 1966,1636 2006,1636 802,1642 842,1643 2227,1645 2267,1645 1326,1654 1366,1654 2501.5,1654 2541.5,1654 1041,1661 1081,1662 2778,1668 2818,1668 1673,1671.32 1713,1672.32 1966,1676 2006,1676 754,1684 2227,1684 794,1685 2267,1685 2501.5,1693 1326,1694 1366,1694 2541.5,1694 2778,1707 2818,1708 1673,1711.32 1713,1711.32 1966,1715 2006,1716 754,1724 794,1724 1326,1733 1366,1734 1673,1751.32 1713,1751.32 754,1764 794,1764 1963.94,1774.18 2003.94,1774.18 1672.56,1792 1712.56,1793 1065,1797 1105,1797 757,1798 2794,1798 2834,1798 797,1799 2524,1799 2564,1799 2244,1804 2284,1804 1963.94,1814.18 2003.94,1814.18 1672.56,1832 1712.56,1832 1065,1837 1105,1837 757,1838 797,1838 2794,1838 2834,1838 2524,1839 2564,1839 1347,1843 1387,1843 1427,1843 2244,1844 2284,1844 1963.94,1853.18 2003.94,1854.18 1672.56,1872 1712.56,1872 1065,1876 1105,1877 2794,1877 757,1878 797,1878 2524,1878 2834,1878 2564,1879 1347,1883 1387,1883 1426,1883 2244,1883 2284,1884 2876,2042.27 2916,2043.27 2558.81,2181.26
GPIOH0_O: Q73.2 R38.2 U4.11 | length 3060.2
  Top Layer w8: v1(1296,1071) 1296,1466 1413,1583 1886.79,1583 2010,1459.79 2010,1323 1986.58,1299.58 U4.11@1945.35,1299.58
  Top Layer w10: R38.2@-35,480.5 14.5,431 61,431
  Top Layer w20: Q73.2@37.82,428.4 v1@371.28,428.4
  Bottom Layer w12: v1(371.28,430.17) 465.17,430.17 1106.6,1071.6 1295.4,1071.6 v1(1296,1071)
GPIOH0_O#: J6.2 Q73.1 R120.1 | length 116.5
  Top Layer w10: R120.1@-35,303 14.5,352.5 61,352.5
GPIOH1_O: Q74.2 R46.2 U4.12 | length 2854.4
  Top Layer w8: v1(1322,1127) 1322,1455 1435,1568 1880.57,1568 1994,1454.57 1994,1335 1978.27,1319.27 U4.12@1945.35,1319.27
  Top Layer w10: R46.2@-35,876.5 14.5,827 61,827
  Top Layer w20: Q74.2@37.68,824.22 v1@371.13,824.22
  Bottom Layer w12: v1(371.13,826) 444.03,753.1 678.1,753.1 1051,1126 1321,1126 v1(1322,1127)
GPIOH1_O#: J6.4 Q74.1 R121.1 | length 116.5
  Top Layer w10: R121.1@-35,699.5 14.5,749 61,749
GPIOH2_O: Q75.2 R48.2 U4.13 | length 2450.8
  Top Layer w8: v1(1347,1269) 1347,1445 1455,1553 1800.74,1553 1888.27,1465.47 U4.13@1888.27,1376.35
  Top Layer w10: R48.2@-35,1276.5 14.5,1227 61,1227
  Top Layer w20: Q75.2@38.69,1224.89 v1(313.89,1224.89)
  Bottom Layer w12: v1(313.89,1224.89) 357.6,1224.89 451.5,1131 608,1131 633,1156 633,1225 677,1269 v1(1347,1269) v1@1345.5,1267.5
GPIOH2_O#: J6.6 Q75.1 R122.1 | length 116.5
  Top Layer w10: R122.1@-35,1100.5 14.5,1150 61,1150
GPIOH3_O: Q76.2 R50.2 U4.14 | length 2358.6
  Top Layer w8: v1(1374,1298) 1374,1435 1477,1538 1794.53,1538 1868.58,1463.94 U4.14@1868.58,1376.35
  Top Layer w12: R50.2@-35,1675.5 16.28,1624.22 Q76.2@39.55,1624.22
  Top Layer w20: Q76.2@39.55,1624.22 v1@373,1624.22
  Bottom Layer w12: v1(373,1626) 469,1626 797,1298 v1(1374,1298)
GPIOH3_O#: J6.8 Q76.1 R123.1 | length 116.5
  Top Layer w10: R123.1@-35,1499.5 14.5,1549 61,1549
GPIOY0_O: R5.2 U4.10 | length 3222.7
  Top Layer w8: v1(1268,1041) 1268,1472 1394,1598 1893,1598 2025,1466 2025,1311 1993.9,1279.9 U4.10@1945.35,1279.9
  Bottom Layer w12: R5.2@193,-38 320,-38 582,224 582,493 1131,1042 1267,1042 v1(1268,1041)
GPIOY1_O: R13.2 U4.15 | length 2451.1
  Top Layer w8: v1(1406,1099) 1406,1432 1496,1522 1788,1522 1848.9,1461.1 U4.15@1848.9,1376.35
  Top Layer w12: v1(147,564) 224,641 v1(313,641)
  Bottom Layer w12: v1(147,564) 191.81,564 R13.2@193,565.19 ; v1(313,641) 620,641 1079,1100 1405,1100 v1(1406,1099)
GPIOY2_O: R14.2 U4.16 | length 2093.4
  Top Layer w8: v1(1434,1154) 1434,1424 1517,1507 1778,1507 1829.21,1455.79 U4.16@1829.21,1376.35
  Bottom Layer w12: R14.2@193,1152 255,1090 988.13,1090 1049.94,1151.81 1431.81,1151.81 v1(1434,1154)
GPIOY3_O: R22.2 U4.18 | length 2212.4
  Top Layer w8: v1(1517,1294) 1517,1438.44 1554.56,1476 1760,1476 1789.84,1446.16 U4.18@1789.84,1376.35
  Top Layer w12: v1(136,1739.22) 225.78,1829 v1(311,1829)
  Bottom Layer w12: v1(136,1739.22) 136.8,1740.02 R22.2@193,1740.02 ; v1(311,1829) 363,1829 860.21,1331.79 1479.21,1331.79 v1(1517,1294) v1@1516.81,1293.81
GPIOY4_O: R21.2 U4.19 | length 1677.7
  Top Layer w8: v1(1547,1362) 1547,1422 1586,1461 1750,1461 1770.16,1440.84 U4.19@1770.16,1376.35
  Top Layer w12: v1(559,1477) 559,1498 v1(647,1586)
  Bottom Layer w12: R21.2@502.12,1333.29 502.12,1370.12 559,1427 v1(559,1477) ; v1(647,1586) 871,1362 v1(1547,1362)
LED_CON_11: P2.1 Q13.3 RP1.2 | length 1205
  Bottom Layer w25: RP1.2@2900,2549.5 P2.1@2900,2490 2974,2490 3089,2375 3089,1621 3002.32,1534.32 Q13.3@2970,1534.32
LED_CON_12: P2.2 Q14.3 RP2.2 | length 1500.7
  Bottom Layer w12: 2929,1567 2998.94,1567 3056,1624.06 3056,1647
  Bottom Layer w20: Q14.3@2696,1534.32 2874.32,1534.32 2907,1567 2929,1567 ; P2.2@2800,2490 2862,2428 2985,2428 3056,2357 3056,1647
  Bottom Layer w25: P2.2@2800,2490 RP2.2@2800,2549.5
LED_CON_13: P2.3 Q15.3 RP3.2 | length 754.3
  Top Layer w25: P2.3@2700,2490 2821,2369 v1(2821,2345.53)
  Bottom Layer w25: P2.3@2700,2490 RP3.2@2700,2549.5 ; v1(2821,2345.53) 2821,2008 2854,1975 Q15.3@2970,1975
LED_CON_14: P2.4 Q16.3 RP4.2 | length 466.1
  Bottom Layer w20: P2.4@2600,2490 2647,2443 2781,2443 2839.18,2384.82 Q16.3@2963,2384.82
  Bottom Layer w25: P2.4@2600,2490 RP4.2@2600,2549.5
LED_CON_15: P2.5 Q25.3 RP5.2 | length 834.7
  Top Layer w25: P2.5@2500,2490 2607,2383 v1(2738,2383)
  Bottom Layer w20: Q25.3@2696,1970 2739,1970 2783,2014 2783,2338 v1(2738,2383)
  Bottom Layer w25: P2.5@2500,2490 RP5.2@2500,2549.5
LED_CON_21: P2.6 Q26.3 RP6.2 | length 392.1
  Bottom Layer w20: P2.6@2400,2490 2437.5,2452.5 2458.5,2452.5 2526.18,2384.82 Q26.3@2689.01,2384.82
  Bottom Layer w25: P2.6@2400,2490 RP6.2@2400,2549.5
LED_CON_22: P2.7 Q27.3 RP7.2 | length 784.5
  Bottom Layer w20: P2.7@2300,2490 2368,2422 2445.5,2422 2525,2342.5 2525,2317
  Bottom Layer w25: P2.7@2300,2490 RP7.2@2300,2549.5 ; Q27.3@2424,1970 2466,1970 2525,2029 2525,2317
LED_CON_23: P2.8 Q28.3 RP8.2 | length 316.4
  Bottom Layer w25: RP8.2@2200,2549.5 P2.8@2200,2490 2305.18,2384.82 Q28.3@2413.36,2384.82
LED_CON_24: P2.9 Q37.3 RP9.2 | length 715.5
  Bottom Layer w25: RP9.2@2100,2549.5 P2.9@2100,2490 2249,2341 2249,2012.15 2208.17,1971.32 Q37.3@2149.46,1971.32
LED_CON_25: P2.10 Q38.3 RP10.2 | length 265.8
  Bottom Layer w25: RP10.2@2000,2549.5 P2.10@2000,2490 2000,2446 2061.18,2384.82 Q38.3@2137.01,2384.82
LED_CON_31: P3.1 Q43.3 RP11.2 | length 825.8
  Bottom Layer w25: RP11.2@1730,2549.5 P3.1@1730,2490 1794,2426 1892,2426 1984.94,2333.06 1984.94,2042.94 1908,1966 Q43.3@1860.62,1966
LED_CON_32: P3.2 Q44.3 RP12.2 | length 335.3
  Bottom Layer w25: RP12.2@1629.89,2549.5 1630,2549.39 P3.2@1630,2490 1735.18,2384.82 Q44.3@1862.2,2384.82
LED_CON_33: P3.3 Q45.3 RP13.2 | length 744.8
  Bottom Layer w25: RP13.2@1530,2549.28 P3.3@1530,2490 1530,2472.75 1683,2319.75 1683,2014 1633.08,1964.08 Q45.3@1557.52,1964.08
LED_CON_34: P3.4 Q46.3 RP14.2 | length 264.8
  Bottom Layer w25: RP14.2@1430,2549.17 P3.4@1430,2490 1430,2425 1470.18,2384.82 Q46.3@1554.01,2384.82
LED_CON_35: P3.5 Q55.3 RP15.2 | length 681.7
  Bottom Layer w25: Q55.3@1253.43,1970 1308,1970 1377,2039 1377,2384 1330,2431 P3.5@1330,2490 RP15.2@1330,2549.06
LED_CON_41: P3.6 Q56.3 RP16.2 | length 173.6
  Bottom Layer w25: RP16.2@1230,2548.94 P3.6@1230,2490 1230,2439 1253,2416 Q56.3@1253,2384.82
LED_CON_42: P3.7 Q57.3 RP17.2 | length 683.5
  Bottom Layer w25: Q57.3@958.01,1971.32 1017.32,1971.32 1079,2033 1079,2439 P3.7@1130,2490 RP17.2@1130,2548.83
LED_CON_43: P3.8 Q58.3 RP18.2 | length 224.1
  Bottom Layer w25: Q58.3@959.76,2384.82 1012.82,2384.82 1030,2402 P3.8@1030,2490 RP18.2@1030,2548.72
LED_CON_44: P3.9 Q67.3 RP19.2 | length 723
  Bottom Layer w25: Q67.3@660,1984 738,1984 800,2046 800,2360 P3.9@930,2490 RP19.2@930,2549.5
LED_CON_45: P3.10 Q68.3 RP20.2 | length 302.6
  Bottom Layer w25: Q68.3@661.09,2384.82 778.82,2384.82 830,2436 P3.10@830,2490 RP20.2@830,2548.5
LED_GPIO_11: Q17.1 Q21.1 R63.1 U4.30 | length 2646.5
  Top Layer w10: U4.30@1614.65,1220.84 1545.84,1220.84 1450,1125 1450,894.03 1555.03,789 2500,789 2618,907 v1(2618,952)
  Bottom Layer w12: v1(2618,952) 2966,952 3007.4,993.4 Q21.1@3007.4,1204.67
  Bottom Layer w20: R63.1@2876.49,1376.5 2876.49,1376 2982.49,1376 3006.9,1351.59 Q21.1@3006.9,1204.67
LED_GPIO_12: Q18.1 Q22.1 R64.1 U4.31 | length 2292
  Top Layer w10: U4.31@1614.65,1201.16 1552.16,1201.16 1467,1116 1467,905 1566,806 2481,806 2582,907 v1(2582,981.5)
  Bottom Layer w12: v1(2582,981.5) 2671.5,981.5 2733.4,1043.4 Q22.1@2733.4,1204.67
  Bottom Layer w20: R64.1@2602.49,1376 2708.49,1376 2732.9,1351.59 Q22.1@2732.9,1204.67
LED_GPIO_13: Q19.1 Q23.1 R65.1 U4.34 | length 2789.4
  Top Layer w10: U4.34@1614.65,1142.1 1567.1,1142.1 1543,1118 1543,858.73 1578.73,823 2463,823 2541.5,901.5 v1(2541.5,981.5)
  Bottom Layer w12: v1(2541.5,981.5) 2541.5,1451.69 2654.81,1565 2871,1565 2896,1590 2983.47,1590 3007.4,1613.93 Q23.1@3007.4,1645.35
  Bottom Layer w20: R65.1@2876.99,1817.18 2876.99,1816.68 2982.99,1816.68 3007.4,1792.27 Q19.1@3007.4,1767.35 Q23.1@3007.4,1645.35
LED_GPIO_14: Q20.1 Q24.1 R66.1 U4.22 | length 2648.2
  Top Layer w8: U4.22@1711.1,1376.35 1711.1,1343.9 1720,1335
  Top Layer w10: 1720,1335 1727,1328 v1(1746,1328)
  Top Layer w12: v1@2355,1427 2355,1359.3 2545.81,1168.5 2922.5,1168.5 3027,1273 v1(3027,2002.5)
  Bottom Layer w8: v1(1746,1328) 1822.81,1404.81 2083.24,1404.81 2114.43,1436 v1(2355,1436)
  Bottom Layer w12: Q24.1@3000.4,2055.18 3000.4,2025.09 3013,2012.5
  Bottom Layer w20: R66.1@2869.99,2220.18 2869.99,2219.68 2975.99,2219.68 3000.4,2195.27 Q20.1@3000.4,2177.18 Q24.1@3000.4,2055.18
LED_GPIO_15: Q29.1 Q33.1 R75.1 U4.38 | length 2189.4
  Top Layer w10: U4.38@1691.42,1045.65 1691.42,885.58 1737,840 2446,840 2506,900 v1(2506,981.5)
  Bottom Layer w12: v1@2506,979 v1(2506,981.5) 2506,1450 2641.62,1585.62 2711.62,1585.62 2733.4,1607.4 Q33.1@2733.4,1645.35
  Bottom Layer w20: R75.1@2602.99,1817.18 2602.99,1816.68 2708.99,1816.68 2733.4,1792.27 2733.4,1767.35 Q33.1@2733.4,1645.35
LED_GPIO_21: Q30.1 Q34.1 R76.1 U4.25 | length 2086.4
  Top Layer w8: v1(1566,1319) 1566.27,1319.27 U4.25@1614.65,1319.27
  Top Layer w12: v1(2356,1468) 2618.5,1468 2726.5,1576 v1(2726.5,2024.5)
  Bottom Layer w8: v1(1566,1319) 1566,1336.26 1635.74,1406 1749,1406 1762.81,1419.81 2077.02,1419.81 2125.21,1468 v1(2356,1468)
  Bottom Layer w12: v1@2726,2023.33 Q34.1@2726,2054
  Bottom Layer w20: R76.1@2596,2220.5 2596,2220 2702,2220 2726.41,2195.59 Q30.1@2726.41,2177.18 Q34.1@2726.41,2055.18
LED_GPIO_22: Q31.1 Q35.1 R77.1 U4.26 | length 1394.2
  Top Layer w8: U4.26@1614.65,1299.58 1667.42,1299.58 1698.81,1268.19 1741.66,1268.19 1781,1307.53 v1(1781,1328)
  Bottom Layer w8: v1(1781,1328) 1781,1329.26 1841.55,1389.81 2093.44,1389.81 2114.63,1411 2368,1411 2388,1431
  Bottom Layer w12: 2388,1431 2461.4,1504.4 Q35.1@2461.4,1640.35
  Bottom Layer w20: R77.1@2330.99,1812.18 2330.99,1811.68 2436.99,1811.68 2461.4,1787.27 Q35.1@2461.4,1640.35
LED_GPIO_23: Q32.1 Q36.1 R78.1 U4.27 | length 1859.3
  Top Layer w8: U4.27@1614.65,1279.9 1665.89,1279.9 1692.6,1253.19 1754.19,1253.19 1812,1311 v1(1812,1328)
  Top Layer w12: v1(2450.5,2021.5) 2450.5,1542.5 v1(2493,1500)
  Bottom Layer w8: v1(1812,1328) 1858.81,1374.81 2100.04,1374.81 2111.23,1386 2379,1386 2414,1421
  Bottom Layer w12: 2414,1421 v1(2493,1500) ; v1@2450,2020.33 Q36.1@2450,2051
  Bottom Layer w20: R78.1@2320.36,2220.5 2320.36,2220 2426.36,2220 2450.76,2195.59 Q32.1@2450.76,2177.18 Q36.1@2450.76,2055.18 Q36.1@2450.76,2048.67
LED_GPIO_24: Q39.1 Q41.1 R85.1 U4.20 | length 937.7
  Top Layer w8: v1(1740.47,1438) 1750.47,1428 U4.20@1750.47,1376.35
  Bottom Layer w8: v1(1740.47,1438) 2074,1438 2126,1490
  Bottom Layer w12: 2126,1490 2186.86,1550.86 Q41.1@2186.86,1641.67
  Bottom Layer w20: R85.1@2056.45,1813.5 2056.45,1813 2162.45,1813 2186.86,1788.59 Q39.1@2186.86,1763.67 Q41.1@2186.86,1641.67
LED_GPIO_25: Q40.1 Q42.1 R86.1 U4.37 | length 2512.8
  Top Layer w10: v1@1671,854 1671,850.73 1671.73,850 U4.37@1671.73,1045.65 ; 2173.91,1583 2173.91,1528.13 2237,1465.04 2237,1441 2417,1261 v1(2417,893)
  Top Layer w12: 2173.91,1583 v1(2173.91,2021.5)
  Bottom Layer w10: v1(1671,847) 2292,847 2338,893 v1(2417,893)
  Bottom Layer w12: v1@2174.41,2022 Q42.1@2174.41,2052.67
  Bottom Layer w20: R86.1@2044,2224.5 2044,2224 2150,2224 2174.41,2199.59 Q40.1@2174.41,2177.18 Q42.1@2174.41,2055.18 Q42.1@2174.41,2052.67
LED_GPIO_31: Q47.1 Q51.1 R94.1 U4.45 | length 960.2
  Top Layer w8: U4.45@1829.21,1045.65 1829.21,1085.57 1810,1104.79 1810,1287 1859.84,1336.84 1904.84,1336.84 1911,1343 v1(1911,1468)
  Bottom Layer w12: Q51.1@1898.02,1636.35 1898.02,1602 1911,1589.02 v1(1911,1468)
  Bottom Layer w20: R94.1@1767.61,1808.17 1767.61,1807.67 1873.61,1807.67 1898.02,1783.27 Q51.1@1898.02,1636.35
LED_GPIO_32: Q48.1 Q52.1 R95.1 U4.39 | length 2314.7
  Top Layer w10: U4.39@1711.1,1045.65 v1(1711.1,1090.9) ; 1900.1,1671.32 1900.1,1658.57 2043.67,1515 2163,1515 2220,1458 2220,1089 2199,1068 v1(2199,893)
  Top Layer w12: 1900.1,1671.32 v1(1900.1,2017.17)
  Bottom Layer w10: v1(1711.1,1090.9) 1782,1020 1782,942 1831,893 v1(2199,893)
  Bottom Layer w12: v1@1899.6,2017.68 Q52.1@1899.6,2048.35
  Bottom Layer w20: R95.1@1769.17,2220.17 1769.19,2219.67 1875.19,2219.67 1899.6,2195.27 Q48.1@1899.6,2177.18 Q52.1@1899.6,2055.18 Q52.1@1899.6,2048.35
LED_GPIO_33: Q49.1 Q53.1 R96.1 U4.40 | length 1817.3
  Top Layer w10: v1(1719,956) 1720,955 1720,952 1730.79,962.79 U4.40@1730.79,1045.65
  Top Layer w12: v1(1395,1806) 1395,1644 1237,1486 1237,1024 1305,956 v1(1424,956)
  Bottom Layer w10: v1(1424,956) v1(1719,956)
  Bottom Layer w12: v1(1395,1806) 1395.26,1806.26 R96.1@1464.12,1806.26
  Bottom Layer w20: R96.1@1464.52,1806.26 1464.52,1805.76 1570.52,1805.76 1594.92,1781.35 Q53.1@1594.92,1634.44
LED_GPIO_34: Q50.1 Q54.1 R97.1 U4.46 | length 1743.9
  Top Layer w8: U4.46@1848.9,1045.65 1848.9,1087.1 1825,1111 1825,1279.16 1861.84,1316 1882,1316 1881,1315 v1(1881,1313) ; v1(1942,1468) 1942,1363.24 1953.24,1352 v1(1970,1352)
  Top Layer w10: 1721.19,1624 1901,1624 v1(1942,1583) 1940,1581 v1@1940,1578
  Top Layer w12: v1(1596.52,2017.26) 1596.52,1672.48 1645,1624 1721.19,1624
  Bottom Layer w8: v1@1881,1311 v1(1881,1313) 1881,1336 1897,1352 v1(1970,1352)
  Bottom Layer w12: v1@1596.02,2017.76 Q54.1@1596.02,2048.44 ; v1(1942,1468) v1(1942,1583)
  Bottom Layer w20: R97.1@1465.61,2220.26 1465.61,2219.76 1571.61,2219.76 1596.02,2195.35 Q50.1@1596.02,2177.18 Q54.1@1596.02,2055.18 Q54.1@1596.02,2048.44
LED_GPIO_35: Q59.1 Q63.1 R106.1 U4.21 | length 929.2
  Top Layer w8: v1(1604,1438) 1702,1438 1730.79,1409.21 U4.21@1730.79,1376.35
  Bottom Layer w12: Q63.1@1290.83,1640.36 1290.83,1516.17 1369,1438 v1(1604,1438)
  Bottom Layer w20: R106.1@1160.43,1812.18 1160.43,1811.68 1266.43,1811.68 1290.83,1787.27 Q59.1@1290.83,1762.36 Q63.1@1290.83,1640.36
LED_GPIO_41: Q60.1 Q64.1 R107.1 U4.42 | length 2423.2
  Top Layer w10: v1@1746,899 v1(1746,897) 1770.16,921.16 U4.42@1770.16,1045.65